# Altium PCB StickHub.altium-saved.PcbDoc
Units mil, origin at the board's own origin, x right, y up, seen from the top; angles counter-clockwise.
Board outline 649.61 x 1574.8 mil, 2 copper layers (Top Layer, Bottom Layer), stack 65.792 mil thick; 94 components, 47 nets, 278 pads, 87 vias.
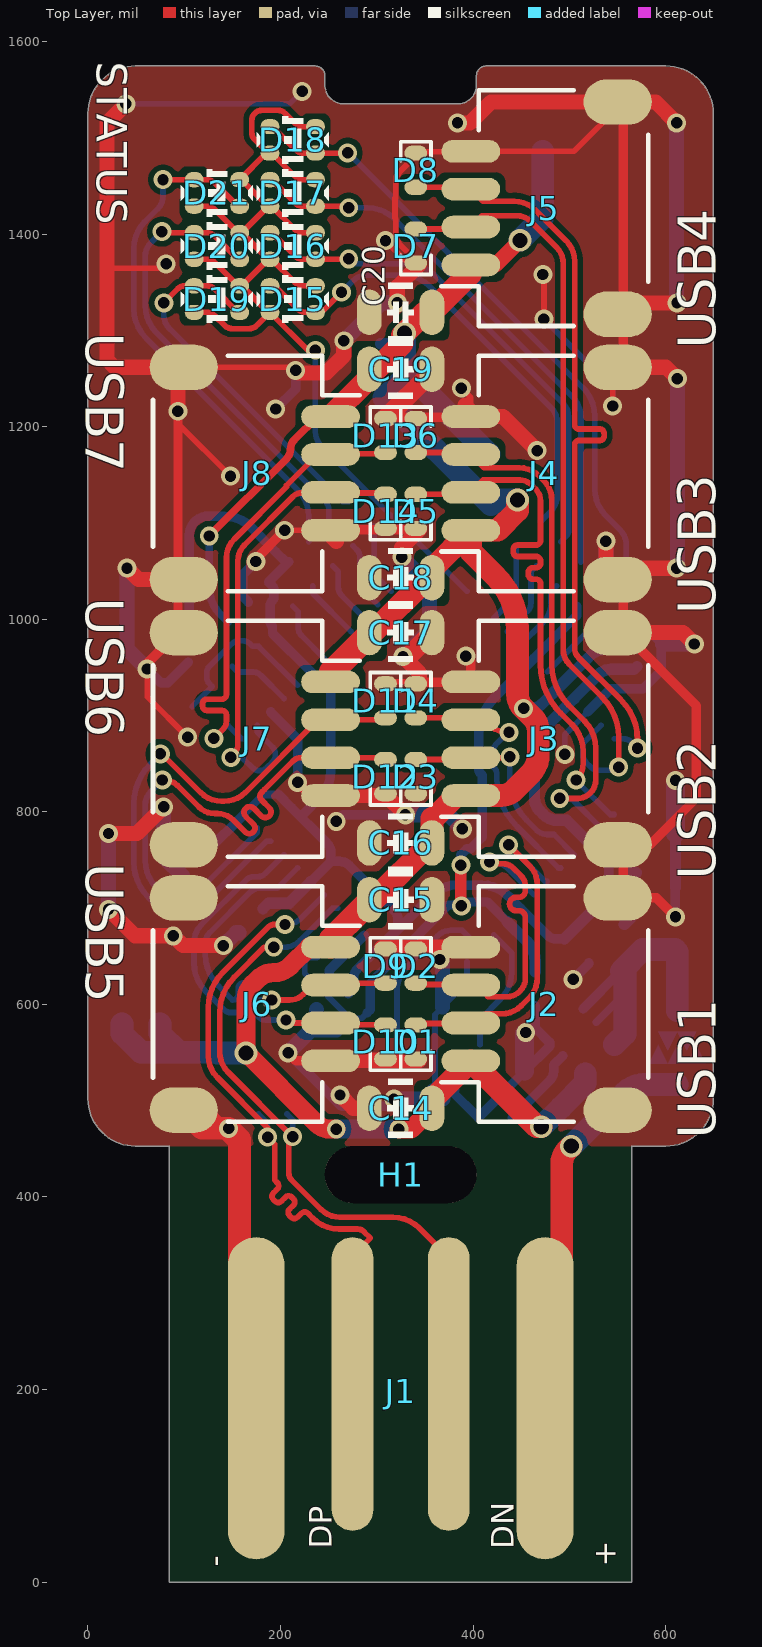
[diagram p0: Top Layer view]
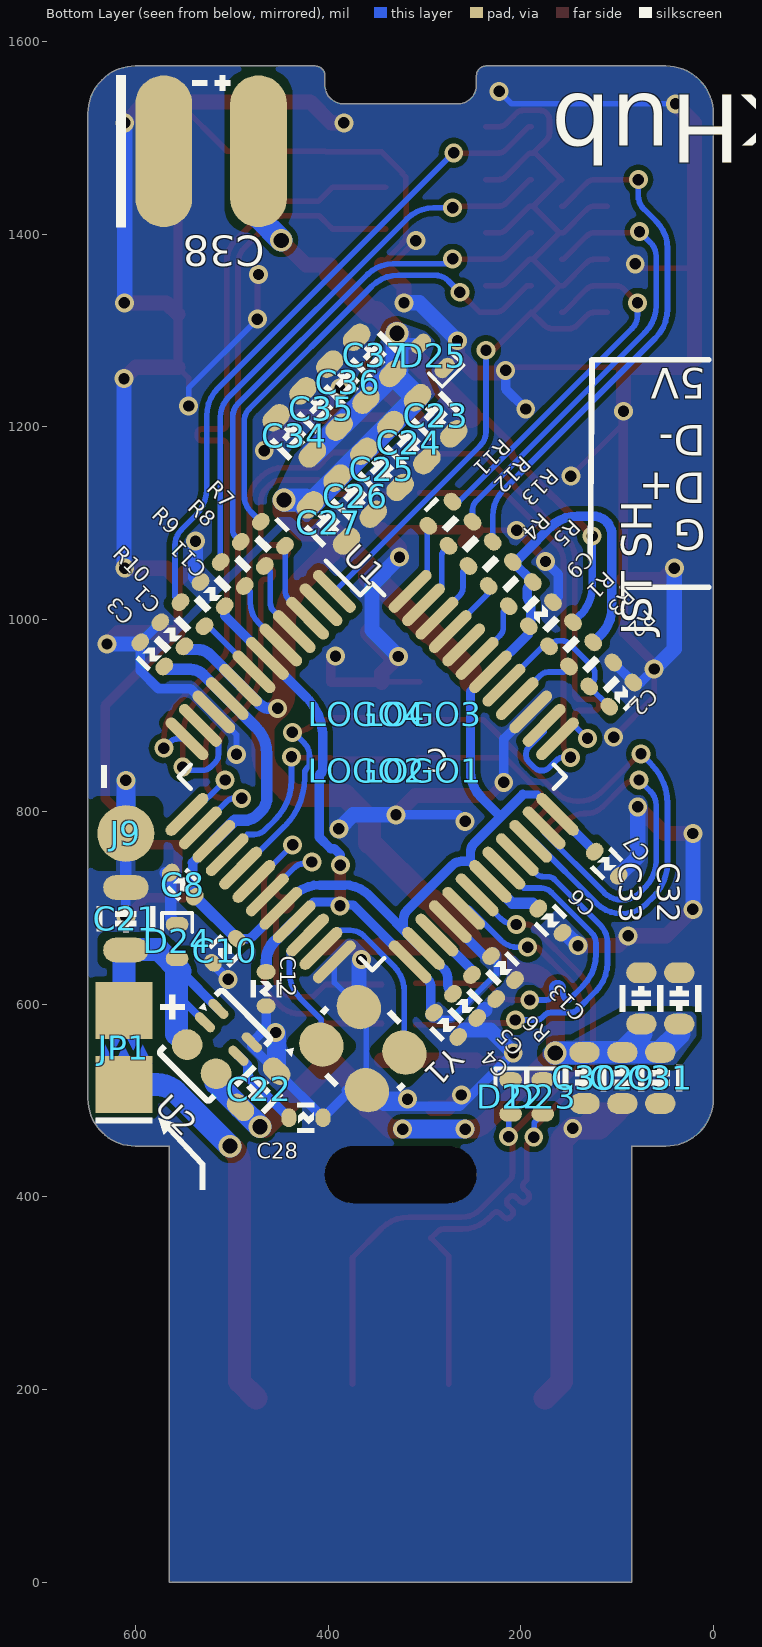
[diagram p1: Bottom Layer view, seen from below]

## Layer stack, top to bottom
Top Solder: solder mask 0.4, Solder Resist, Dk 3.5
Top Layer: signal copper 1.4
Dielectric 1: core 62.9921, FR-4, Dk 4.5
Bottom Layer: signal copper 1.4
Bottom Solder: solder mask 0.4, Solder Resist, Dk 3.5

## Board outline
403.54,1555.12 403.54,1564.96 cw(c413.39,1564.96) 413.39,1574.8 600.39,1574.8 cw(c600.39,1525.59) 649.61,1525.59 649.61,501.97 cw(c600.39,501.97) 600.39,452.76 564.96,452.76 564.96,0 84.65,0 84.65,452.76 49.21,452.76 cw(c49.21,501.97) 0,501.97 0,1525.59 cw(c49.21,1525.59) 49.21,1574.8 236.22,1574.8 cw(c236.22,1564.96) 246.06,1564.96 246.06,1555.12 ccw(c265.75,1555.12) 265.75,1535.43 383.86,1535.43 ccw(c383.86,1555.12)

## Design rules (kind name [scope] priority, off if disabled: settings)
BoardOutlineClearance [All] p1: gap=0 ignorepadtopadclearanceinfootprint=FALSE
Clearance [All] p1: gap=5.91 ignorepadtopadclearanceinfootprint=FALSE
DiffPairsRouting [All] p1: maxlimit=5.91 minlimit=5.91 mostfreqgap=5.91 toplayer_minwidth=15 toplayer_maxwidth=15 toplayer_prefwidth=5.91 bottomlayer_minwidth=15 bottomlayer_maxwidth=15 bottomlayer_prefwidth=15 maxuncoupledlength=500
HoleSize [All] p1: absolutevalues=TRUE maxlimit=157.48 minlimit=9.84 maxpercent=80.000 minpercent=20.000
HoleToHoleClearance [All] p1: gap=9.84 allowstackedmicrovias=FALSE
MinimumAnnularRing [All] p1: minimumring=3.94
PolygonConnect "PolygonConnect_Polygon 0" [InNamedPolygon('Polygon 0')] p1: connectstyle=Direct reliefconductorwidth=10 reliefentries=4 polygonreliefangle="90 Angle" airgapwidth=10
PolygonConnect "PolygonConnect_Polygon 1" [InNamedPolygon('Polygon 1')] p2: connectstyle=Direct reliefconductorwidth=10 reliefentries=4 polygonreliefangle="90 Angle" airgapwidth=10
PolygonConnect "PolygonConnect_Polygon 2" [InNamedPolygon('Polygon 2')] p3: connectstyle=Direct reliefconductorwidth=10 reliefentries=4 polygonreliefangle="90 Angle" airgapwidth=10
PolygonConnect "PolygonConnect_Polygon 3" [InNamedPolygon('Polygon 3')] p4: connectstyle=Direct reliefconductorwidth=10 reliefentries=4 polygonreliefangle="90 Angle" airgapwidth=10
PolygonConnect "PolygonConnect_Polygon 4" [InNamedPolygon('Polygon 4')] p5: connectstyle=Direct reliefconductorwidth=10 reliefentries=4 polygonreliefangle="90 Angle" airgapwidth=10
PolygonConnect [All] p6: connectstyle=Relief reliefconductorwidth=19.68 reliefentries=4 polygonreliefangle="90 Angle" airgapwidth=19.68
RoutingVias [All] p1: holewidth=11.81 width=19.68 viastyle="Through Hole" minholewidth=9.84 minwidth=19.68 maxholewidth=15.75 maxwidth=23.62
SilkToSilkClearance [All] p1: silktosilkclearance=0
SolderMaskExpansion [All] p1: expansion=0 istentingtop=FALSE
Width [All] p1: maxlimit=23.62 minlimit=5.91 preferedwidth=5.91
26 further rules are at their usual default settings.

## Components (designator, comment, footprint, x,y, rotation, side; value= is the part's Value field where it differs from the comment)
C1 "1uF 10V" 1005_C 561.93,984.46 r45 bottom
C2 "0.1uF" 1005_C 95.63,921.82 r135 bottom
C3 "10uF 6.3V" 1005_C 582.81,963.58 r45 bottom
C4 "10uF 6.3V" 1005_C 277.56,578.74 r225 bottom
C5 "0.1uF" 1005_C 257.87,598.43 r225 bottom
C6 "0.1uF" 1005_C 169.29,687.01 r225 bottom
C7 "0.1uF" 1005_C 110.74,746.14 r225 bottom
C8 "0.1uF" 1005_C 551.18,724.41 r45 bottom
C9 "0.1uF" 1005_C 179.14,1005.34 r135 bottom
C10 "0.1uF" 1005_C 507.44,655.66 r315 bottom
C11 "0.1uF" 1005_C 520.17,1026.22 r45 bottom
C12 "0.1uF" 1005_C 464.57,616.14 r270 bottom
C13 "0.1uF" 1005_C 218.5,637.8 r225 bottom
C14 "0.1uF 100V" 2012_C 324.8,492.13 r180 top
C15 "0.1uF 100V" 2012_C 324.8,708.66 r0 top
C16 "0.1uF 100V" 2012_C 324.8,767.72 r180 top
C17 "0.1uF 100V" 2012_C 324.8,986.22 r0 top
C18 "0.1uF 100V" 2012_C 324.8,1043.31 r180 top
C19 "0.1uF 100V" 2012_C 324.8,1259.84 r0 top
C20 "0.1uF 100V" 2012_C 324.8,1318.9 r180 top
C21 "0.1uF 100V" 2012_C 610.24,688.98 r90 bottom
C22 "22uF 10V" 1608_C 472.44,511.81 r135 bottom
C23 "22uF 10V" 1608_C 288.53,1211.47 r225 bottom
C24 "22uF 10V" 1608_C 316.37,1183.63 r225 bottom
C25 "22uF 10V" 1608_C 344.21,1155.79 r225 bottom
C26 "22uF 10V" 1608_C 372.05,1127.95 r225 bottom
C27 "22uF 10V" 1608_C 399.89,1100.11 r225 bottom
C28 "15nF" 1005_C 423.23,482.28 r180 bottom
C29 "22uF 10V" 1608_C 94.49,523.62 r270 bottom
C30 "22uF 10V" 1608_C 133.86,523.62 r270 bottom
C31 "22uF 10V" 1608_C 55.12,523.62 r270 bottom
C32 "22uF 10V" 1608_C 35.43,606.3 r90 bottom
C33 "22uF 10V" 1608_C 74.8,606.3 r90 bottom
C34 "22uF 10V" 1608_C 435.32,1190.67 r45 bottom
C35 "22uF 10V" 1608_C 407.48,1218.5 r45 bottom
C36 "22uF 10V" 1608_C 379.64,1246.34 r45 bottom
C37 "22uF 10V" 1608_C 351.8,1274.18 r45 bottom
C38 "330uF 10V" CP_Elec_6.3x11_Board_Edge_Mirrored 521.65,1574.8 r180 bottom
D1 "TVS" D_0402 340.55,561.02 r90 top
D2 "TVS" D_0402 340.55,639.76 r270 top
D3 "TVS" D_0402 340.55,836.61 r90 top
D4 "TVS" D_0402 340.55,915.35 r270 top
D5 "TVS" D_0402 340.55,1112.2 r90 top
D6 "TVS" D_0402 340.55,1190.94 r270 top
D7 "TVS" D_0402 340.55,1387.8 r90 top
D8 "TVS" D_0402 340.55,1466.54 r270 top
D9 "TVS" D_0402 309.06,639.76 r270 top
D10 "TVS" D_0402 309.06,561.02 r90 top
D11 "TVS" D_0402 309.06,915.35 r270 top
D12 "TVS" D_0402 309.06,836.61 r90 top
D13 "TVS" D_0402 309.06,1190.94 r270 top
D14 "TVS" D_0402 309.06,1112.2 r90 top
D15 "USB" Duo_LED_1.6x0.8_Kingbright_APHB1608LZGKSURKC 212.71,1332.68 r0 top
D16 "USB" Duo_LED_1.6x0.8_Kingbright_APHB1608LZGKSURKC 212.71,1387.8 r0 top
D17 "USB" Duo_LED_1.6x0.8_Kingbright_APHB1608LZGKSURKC 212.71,1442.91 r0 top
D18 "USB" Duo_LED_1.6x0.8_Kingbright_APHB1608LZGKSURKC 212.71,1498.03 r0 top
D19 "USB" Duo_LED_1.6x0.8_Kingbright_APHB1608LZGKSURKC 133.97,1332.68 r0 top
D20 "USB" Duo_LED_1.6x0.8_Kingbright_APHB1608LZGKSURKC 133.97,1387.8 r0 top
D21 "USB" Duo_LED_1.6x0.8_Kingbright_APHB1608LZGKSURKC 133.97,1442.91 r0 top
D22 "TVS" D_0402 210.63,503.94 r270 bottom
D23 "TVS" D_0402 177.17,503.94 r270 bottom
D24 "5V" D_0402 557.09,665.35 r270 bottom
D25 "5V" D_0402 291.34,1273.62 r45 bottom
H1 "Strap" Plain_Hole_3mm 324.8,423.23 r0 top
J1 "HOST" USB_A_PCB_traces_small 324.8,0 r90 top
J2 "USB1" JST_SH_SM04B-SRSS-TB_1x04-1MP_P1.00mm_Horizontal 476.38,600.39 r90 top
J3 "USB2" JST_SH_SM04B-SRSS-TB_1x04-1MP_P1.00mm_Horizontal 476.38,875.98 r90 top
J4 "USB3" JST_SH_SM04B-SRSS-TB_1x04-1MP_P1.00mm_Horizontal 476.38,1151.57 r90 top
J5 "USB4" JST_SH_SM04B-SRSS-TB_1x04-1MP_P1.00mm_Horizontal 476.38,1427.17 r90 top
J6 "USB5" JST_SH_SM04B-SRSS-TB_1x04-1MP_P1.00mm_Horizontal 173.23,600.39 r270 top
J7 "USB6" JST_SH_SM04B-SRSS-TB_1x04-1MP_P1.00mm_Horizontal 173.23,875.98 r270 top
J8 "USB7" JST_SH_SM04B-SRSS-TB_1x04-1MP_P1.00mm_Horizontal 173.23,1151.57 r270 top
J9 "EXTGND" 1P-1.5x1.5 610.24,777.56 r0 bottom
JP1 "EXTPWR" JP-2_1.5x1.5 610.24,555.12 r90 bottom
LOGO1 "Logo" Creative_Commons_CC_Mask 301.18,842.52 r180 bottom
LOGO2 "Logo" Creative_Commons_BY_Mask 360.24,842.52 r0 bottom
LOGO3 "Logo" Creative_Commons_NC_Mask 301.18,901.57 r0 bottom
LOGO4 "Logo" Creative_Commons_SA_Mask 360.24,901.57 r0 bottom
R1 "10k" R_1005_C 158.26,984.46 r315 bottom
R2 "100k" R_1005_C 116.51,942.7 r135 bottom
R3 "100k" R_1005_C 137.39,963.58 r315 bottom
R4 "100k" R_1005_C 220.9,1047.09 r315 bottom
R5 "100k" R_1005_C 200.02,1026.22 r315 bottom
R6 "2.7k" R_1005_C 238.19,618.11 r225 bottom
R7 "470" R_1005_C 457.53,1088.85 r225 bottom
R8 "470" R_1005_C 478.41,1067.97 r225 bottom
R9 "470" R_1005_C 499.29,1047.09 r225 bottom
R10 "470" R_1005_C 541.05,1005.34 r225 bottom
R11 "470" R_1005_C 283.54,1109.73 r315 bottom
R12 "470" R_1005_C 262.66,1088.85 r315 bottom
R13 "470" R_1005_C 241.78,1067.97 r315 bottom
U1 "MaxLinear_XR22417-48" LQFP-48_7x7mm_P0.5mm 354.33,836.61 r225 bottom
U2 "Dialog_SLG5NT1487V" TDFN-8_1.5x2mm_Fused-Lead_JEDEC_MO-252_W2015D 517.72,557.09 r225 bottom
Y1 "12MHz 50ppm 16-20pF" Crystal_4-SMD_2.5x2mm 364.07,554.05 r225 bottom

## Footprints (in the part's own frame and the unit in brackets; to place one, negate y for a bottom-side part, rotate by r counter-clockwise, add the part's x,y. Pads: shape width x height; smd on the part's side, far side on the other; paste and mask are expansions set on the pad)
1P-1.5x1.5 [mm]
  round 1.5 smd paste-1.5: 1(0,0)
1005_C [mm]
  oval 0.4x0.5 smd: 1(-0.45,0) 2(0.45,0)
  silkscreen extent -0.23,-0.4 0.23,0.4
1608_C [mm]
  oval 0.55x0.8 smd: 1(-0.675,0) 2(0.675,0)
  silkscreen extent -0.35,-0.57 0.35,0.58
2012_C [mm]
  oval 0.65x1.2 smd: 1(-0.825,0) 2(0.825,0)
  silkscreen extent -0.35,-0.77 0.35,0.77
CP_Elec_6.3x11_Board_Edge_Mirrored [mm]
  oval 1.5x4 smd paste-4: 1(1.25,-2.25) 2(-1.25,-2.25)
  silkscreen extent -2.5,-4.25 0.5,-0.25
Creative_Commons_BY_Mask [mil]
Creative_Commons_CC_Mask [mil]
Creative_Commons_NC_Mask [mil]
Creative_Commons_SA_Mask [mil]
Crystal_4-SMD_2.5x2mm [mm]
  oval 1.2x1.1 smd paste-1.2: 1(-0.85,-0.7) 2(0.85,-0.7) 3(0.85,0.7) 4(-0.85,0.7)
  round 1 smd: ""(-0.85,-0.7) ""(-0.85,0.7) ""(0.85,-0.7) ""(0.85,0.7)
  silkscreen extent -1.5,-1.47 1.5,1.25, body extent -2.75,-2.75 2.75,2.75, height 1.6
D_0402 [mm]
  oval 0.4x0.6 smd: 1(-0.45,0) 2(0.45,0)
  silkscreen extent -0.75,-0.4 -0.25,0.4
Duo_LED_1.6x0.8_Kingbright_APHB1608LZGKSURKC [mm]
  oval 0.5x0.4 smd: GA(0.6,-0.35) GK(-0.6,-0.35) RA(0.6,0.35) RK(-0.6,0.35)
  silkscreen extent -0.95,-0.63 0.95,0.63, body extent -0.95,-0.65 0.95,0.65, height 1.6
JP-2_1.5x1.5 [mm]
  rect 1.5x1.5 smd paste-1.5: 1(-0.975,0.05) 2(0.975,0.05)
  Top Layer region: 0.075,0.05 -0.425,-0.2 -0.425,0.3
  Top Layer region: 0.075,-0.45 -0.425,-0.7 -0.425,-0.2
  Top Layer region: 0.075,0.55 -0.425,0.3 -0.425,0.8
  Top Layer region: -0.075,-0.2 0.425,0.05 0.425,-0.45
  Top Layer region: -0.075,0.3 0.425,0.55 0.425,0.05
  silkscreen extent -2,-0.7 -1.85,0.8
JST_SH_SM04B-SRSS-TB_1x04-1MP_P1.00mm_Horizontal [mm]
  oval 0.6x1.55 smd: 1(-1.5,2) 2(-0.5,2) 3(0.5,2) 4(1.5,2)
  oval 1.2x1.8 smd: MP(-2.8,-1.875) MP(2.8,-1.875)
  silkscreen extent -3.11,-2.69 3.11,2.78, body extent -3.9,-3.28 3.9,3.28, height 1.6
LQFP-48_7x7mm_P0.5mm [mm]
  oval 1.475x0.3 smd: 1(-4.162,2.75) 2(-4.162,2.25) 3(-4.162,1.75) 4(-4.162,1.25) 5(-4.162,0.75) 6(-4.162,0.25) 7(-4.162,-0.25) 8(-4.162,-0.75) 9(-4.162,-1.25) 10(-4.162,-1.75) 11(-4.162,-2.25) 12(-4.162,-2.75) 25(4.163,-2.75) 26(4.162,-2.25) 27(4.163,-1.75) 28(4.163,-1.25) 29(4.163,-0.75) 30(4.162,-0.25) 31(4.163,0.25) 32(4.163,0.75) 33(4.163,1.25) 34(4.162,1.75) 35(4.162,2.25) 36(4.163,2.75)
  oval 0.3x1.475 smd: 13(-2.75,-4.162) 14(-2.25,-4.162) 15(-1.75,-4.162) 16(-1.25,-4.162) 17(-0.75,-4.162) 18(-0.25,-4.162) 19(0.25,-4.162) 20(0.75,-4.162) 21(1.25,-4.162) 22(1.75,-4.162) 23(2.25,-4.162) 24(2.75,-4.162) 37(2.75,4.163) 38(2.25,4.162) 39(1.75,4.162) 40(1.25,4.163) 41(0.75,4.163) 42(0.25,4.163) 43(-0.25,4.162) 44(-0.75,4.162) 45(-1.25,4.163) 46(-1.75,4.163) 47(-2.25,4.162) 48(-2.75,4.163)
  silkscreen extent -4.9,-3.61 3.61,3.61
Plain_Hole_3mm [mm]
  oval 4x1.5 hole 1.5 slot 4 at 0 deg unplated: ""(0,0)
R_1005_C [mm]
  oval 0.4x0.5 smd: 1(-0.45,0) 2(0.45,0)
  silkscreen extent -0.23,-0.4 0.23,0.4
TDFN-8_1.5x2mm_Fused-Lead_JEDEC_MO-252_W2015D [mm]
  oval 0.65x0.25 smd: 1(-0.625,0.75) 2(-0.625,0.25) 7(0.625,0.25) 8(0.625,0.75)
  oval 0.815x0.8 smd: 3(-0.543,-0.5) 5(0.543,-0.5)
  silkscreen extent -1,-1.25 1,1.25, body extent -2,-2 2,2, height 1.6
USB_A_PCB_traces_small [mm]
  oval 8.5x1.5 smd paste-8.5: 1(4.85,-3.81) 4(4.85,3.81)
  oval 7.75x1.1 smd paste-7.75: 2(5.225,-1.27) 3(5.225,1.27)

## Via types
v1: diameter 19.68, hole 11.81, Top Layer to Bottom Layer, 81 vias
v2: diameter 23.62, hole 15.75, Top Layer to Bottom Layer, 6 vias

## Nets (pads, with @x,y where several pads share a name; then routed paths per layer and width w, separated by ;. In a path a pad name is that pad's centre, name@x,y a point inside that pad or via, vN(x,y) a via of type N, cw(c..) or ccw(c..) an arc to the next point about the centre after c; other vN are vias at no path point)
+1V8: C4.1 C11.1 C12.1 C13.1 U1.6 U1.21 U1.25 U1.28 | length 809.4
  Top Layer w11.81: v1(387.4,744.69) 387.4,702.76 v1(387.8,702.36)
  Bottom Layer w5.91: C13.1 225.32,644.62 225.32,632.09 271.85,585.56 284.38,585.56 C4.1
  Bottom Layer w9.84: C13.1 237.64,650.32 U1.28 ; C4.1 293.33,594.52 293.33,617.61 cw(c305.15,617.61) 296.79,625.96 U1.25 374.09,703.26 386.9,703.26 v1(387.8,702.36) ; v1(387.4,744.69) 387.4,755.51 393.56,761.67 397.49,761.67 409.59,773.77 409.59,838.14 406.92,840.82 405.72,843.71 405.71,845.27 405.71,877.45 405.79,882.09 407.24,891.26 410.11,900.09 414.33,908.36 419.78,915.87 423.01,919.21 U1.6 507.64,1003.85 C11.1 ; v1@387.8,702.81 v1(387.8,702.36) ; U1.21 414.98,706.37 391.8,706.37 v1(387.8,702.36)
  Bottom Layer w11.81: U1.21 455.92,665.43 cw(c435.04,644.55) 464.57,644.55 C12.1
+3.3V: C3.1 C5.1 C6.1 C7.1 C8.1 C9.1 C10.1 R3.1 R4.1 R5.1 U1.9 U1.15 U1.20 U1.26 U1.31 U1.36 U1.42 | length 1698.3
  Bottom Layer w7.87: U1.36 182.68,818.08 197.76,818.08
  Bottom Layer w9.84: C7.1 U1.36 ; R3.1 116.85,984.12 cw(c144.68,1011.96) 105.31,1011.96 105.31,1087.6 cw(c125,1087.6) 125,1107.28 141.56,1107.28 cw(c141.56,1067.91) 169.4,1095.75 195.08,1070.07 205.53,1059.62 R4.1 R5.1 191.47,1034.77 cw(c187.3,1030.59) 193.2,1030.59 193.2,1023.51 cw(c187.3,1023.51) 191.47,1019.34 191.18,1019.05 ccw(c195.36,1014.87) 189.45,1014.87 189.45,997.47 ccw(c195.36,997.47) 191.18,993.3 C9.1 191.67,985.35 U1.42 252.28,924.75 252.28,843.79 252.28,842.53 cw(c212.91,842.53) 240.75,814.7 222.9,796.85 218.99,796.85 211.68,804.16 ; 197.76,818.08 211.68,804.16 ; U1.31 252.28,748.48 ; C5.1 272.65,613.2 ccw(c264.3,621.55) 276.11,621.55 276.11,628.22 cw(c287.92,628.22) 279.57,636.58 U1.26 ; C10.1 485.89,668.19 cw(c485.89,680) 477.54,671.65 U1.20 436.7,712.48 ccw(c408.86,684.65) 408.86,724.02 383.06,724.02 ccw(c383.06,688.58) 358.01,713.64 302.47,658.1 U1.26 ; U1.15 541.17,747.21 540.98,747.02 540.98,714.2 C8.1 C8.1@541.17,714.4 ; 211.68,804.16 243.94,771.9 248.24,767.6 cw(c238.5,757.85) 252.28,757.85 252.28,748.48 ; 252.28,748.48 261.65,748.48 cw(c261.65,734.7) 271.39,744.44 317.84,698 cw(c308.09,688.26) 321.87,688.26 321.87,678.88 U1.26
  Bottom Layer w11.81: C6.1 187.53,705.24 209.04,705.24 U1.31 ; C10.1@494.96,668.19 C8.1 ; U1.15 497.16,791.22 487.4,791.22 cw(c487.4,810.91) 473.48,796.99 469.55,800.93 cw(c483.46,814.85) 463.78,814.85 463.78,860.16 cw(c503.15,860.16) 475.31,888 U1.9 529.56,942.25 cw(c543.48,928.33) 543.48,948.01 567.24,948.01 C3.1
+5V: C1.1 C14.1 C15.1 C16.1 C17.1 C18.1 C19.1 C20.1 C22.1 C23.1 C24.1 C25.1 C26.1 C27.1 C29.1 C30.1 C31.1 C32.1 C33.1 C34.1 C35.1 C36.1 C37.1 C38.1 D25.2 J2.1 J3.1 J4.1 J5.1 J6.1 J7.1 J8.1 R1.1 U1.8 U2.5 | length 3452.6
  Top Layer w7.87: v1(125.98,1086.61) 206.28,1166.91 ccw(c196.54,1176.66) 210.32,1176.66 cw(c224.1,1176.69) 214.36,1186.43 238.56,1210.63 J8.1
  Top Layer w15.75: J7.1@248.03,935.04 J7.1@251.97,938.98 ; J8.1@250.43,1210.63 328.74,1288.94 v2(328.74,1297.24) J5.1@399.61,1368.11 ; J6.1 292.32,699.8 C15.1 ; J7.1@253.94,938.98 283.66,968.7 283.66,970.67 293.31,980.32 293.31,984.25 355.91,1046.85 C18.1@356.3,1046.85 ; C18.1@356.3,1045.28 C18.1@356.3,1046.85 ; J5.1 423.23,1368.11 v2(448.82,1393.7) ; J4.1@425.59,1092.52 403.54,1092.52 400.79,1092.52 356.3,1048.03 C18.1@356.3,1046.85 ; v1(452.62,907.48) 469.63,890.47
  Top Layer w19.68: J6.1 229.65,659.45 210.19,639.99 cw(c193.48,656.69) 193.48,633.07 192.86,633.07 ccw(c192.86,609.45) 176.15,626.15 171.09,621.09 ccw(c187.8,604.39) 164.17,604.39 v2(164.17,549.61) 237.54,476.24 ccw(c251.46,490.16) 251.46,470.47 v1(257.87,470.47) ; v1(322.83,470.47) 335.63,470.47 C14.1
  Top Layer w23.62: J6.1 251.97,668.31 C15.1 296.75,708.66 355.81,767.72 C16.1 357.28,793.11 358.91,793.11 382.73,816.93 J3.1 428.85,816.93 ccw(c428.85,836.61) 442.77,822.69 459.12,839.04 ccw(c438.24,859.92) 467.77,859.92 467.77,884.17 ccw(c448.09,884.17) 462,898.09 v1(452.62,907.48) 451.83,908.27 cw(c465.75,922.19) 446.06,922.19 446.06,989.43 ccw(c367.32,989.43) 423,1045.11 397.64,1070.47 J4.1 ; J7.1 251.97,945.87 C17.1 295.77,986.22 352.85,1043.31 C18.1 357.28,1052.17 J4.1 ; J8.1 292.32,1250.98 C19.1 299.65,1259.84 326.57,1286.77 326.57,1295.08 v2(328.74,1297.24) 350.39,1318.9 C20.1 J5.1@397.64,1359.25 ; C14.1 357.28,500.98 J2.1 466.14,472.83 v2(470.87,472.83) ; v2(446.06,1124.02) 446.06,1112.99 425.59,1092.52 J4.1
  Bottom Layer w7.87: v1(125.98,1086.61) 125.98,1033.04 ccw(c165.35,1033.04) 137.52,1005.21 R1.1
  Bottom Layer w11.81: D25.2 317.65,1286.15 v2(328.74,1297.24) ; v1(452.62,907.48) 460.43,907.48 ccw(c460.43,923.22) 471.56,912.09 U1.8 522.44,962.96 cw(c536.36,949.04) 536.36,968.73 546.2,968.73 C1.1
  Bottom Layer w19.68: v1(257.87,470.47) v1(322.83,470.47)
  Bottom Layer w23.62: C32.1 35.43,569.88 C31.1 C29.1 ; C33.1 74.8,569.88 C29.1 ; v2(164.17,549.61) 134.45,549.61 C30.1 C29.1 ; v2@328.18,1296.68 v2(328.74,1297.24) 328.74,1259.66 C37.1 ; C34.1 C37.1 ; v2(446.06,1124.02) 423.79,1124.02 C27.1 C23.1 307.88,1230.26 C37.1 ; v2(448.82,1393.7) 472.44,1417.32 C38.1 ; v2(470.87,472.83) 471.05,472.83 C22.1 516.53,518.32 U2.5
/D+: D23.2 J1.3 U1.30 | length 738.3
  Top Layer w5.91: v1(204.63,683.04) 193.97,683.04 ccw(c193.97,673.2) 187.01,680.16 139.99,633.14 ccw(c176.18,596.95) 125,596.95 125,546.54 ccw(c156.5,546.54) 134.22,524.27 186.58,471.91 v1(186.58,462.17) 193.9,454.85 193.9,417.52 196.65,414.76 197.31,413.94 197.77,412.98 198.01,411.95 198.01,410.89 197.77,409.86 197.31,408.91 196.65,408.08 192.58,404.01 191.92,403.18 191.46,402.23 191.23,401.2 191.23,400.14 191.46,399.11 191.92,398.16 192.58,397.33 194.25,395.66 195.08,395 196.03,394.54 197.06,394.3 198.12,394.3 199.15,394.54 200.1,395 200.93,395.66 205.01,399.73 205.83,400.39 206.79,400.85 207.82,401.08 208.87,401.08 209.91,400.85 210.86,400.39 211.69,399.73 213.36,398.06 214.02,397.23 214.48,396.28 214.71,395.25 214.71,394.19 214.48,393.16 214.02,392.21 213.36,391.38 209.28,387.31 208.62,386.48 208.17,385.53 207.93,384.49 207.93,383.44 208.17,382.41 208.62,381.45 209.28,380.62 210.95,378.95 211.78,378.29 212.73,377.84 213.77,377.6 214.82,377.6 215.85,377.84 216.81,378.29 217.64,378.95 221.71,383.03 222.54,383.69 223.49,384.15 224.52,384.38 225.58,384.38 226.61,384.15 227.56,383.69 228.39,383.03 233.12,378.29 233.25,378.17 ccw(c261.09,406) 261.09,366.63 279.88,366.63 cw(c279.88,356.79) 286.84,363.75 293.31,357.28 274.8,338.78 274.8,295.59 J1.3
  Bottom Layer w5.91: D23.2 186.02,477.36 186.02,462.73 v1(186.58,462.17) ; v1(204.63,683.04) 206.53,683.04 ccw(c206.53,702.73) 220.44,688.81 U1.30
/D-: D22.2 J1.2 U1.29 | length 734.5
  Top Layer w5.91: v1(192.95,659.41) 182.97,659.41 152.19,628.64 ccw(c189.33,591.5) 136.81,591.5 136.81,550.29 ccw(c165.56,550.29) 145.23,529.97 v1(212.6,462.6) 208.66,458.66 208.66,424.55 ccw(c218.5,424.55) 211.54,417.59 242.12,387.01 ccw(c261.61,406.5) 261.61,378.94 316.57,378.94 cw(c316.57,339.57) 344.41,367.41 374.8,337.01 J1.2
  Bottom Layer w5.91: v1(192.95,659.41) 203.61,659.41 ccw(c203.61,683.04) 220.32,666.33 253.84,699.86 U1.29 ; D22.2@206.69,486.22 212.6,480.32 v1(212.6,462.6)
/LC: D15.GK D15.RA D16.GK D16.RA D17.GK D17.RA D18.GK D18.RA D19.GK D19.RA D20.GK D20.RA D21.GK D21.RA U1.1 | length 1132.5
  Top Layer w5.91: D19.GK 123.28,1318.9 cw(c123.28,1307.09) 131.63,1315.44 141.64,1305.43 ccw(c149.99,1313.78) 149.99,1301.97 167.26,1301.97 ccw(c167.26,1313.78) 175.62,1305.43 D15.GK ; D20.GK 123.28,1374.02 cw(c123.28,1362.2) 131.63,1370.56 155.73,1346.46 D19.RA D19.RA@159.67,1346.46 ; D21.GK 123.28,1429.13 cw(c123.28,1417.32) 131.63,1425.67 155.73,1401.57 D20.RA D20.RA@159.67,1401.57 ; v1(236.22,1279.53) 228.46,1279.53 D15.GK ; D15.RA 223.4,1346.46 cw(c223.4,1358.27) 215.04,1349.92 190.94,1374.02 D16.GK D16.GK@187.23,1374.02 ; D16.RA 223.4,1401.57 cw(c223.4,1413.39) 215.04,1405.03 190.94,1429.13 D17.GK ; D17.RA 223.4,1456.69 cw(c223.4,1468.5) 215.04,1460.15 190.94,1484.25 D18.GK ; D18.RA 222.58,1511.81 cw(c222.58,1521.65) 215.62,1514.69 207.48,1522.83 204.46,1525.86 ccw(c197.5,1518.9) 197.5,1528.74 180.46,1528.74 ccw(c180.46,1518.9) 173.5,1525.86 173.07,1525.43 ccw(c180.03,1518.47) 170.19,1518.47 170.19,1505.37 ccw(c180.03,1505.37) 173.07,1498.41 187.23,1484.25 D18.GK ; D19.RA@159.67,1346.46 D16.GK@187.23,1374.02 ; D19.RA@159.67,1346.46 187.23,1318.9 D15.GK ; D20.RA@159.67,1401.57 D16.GK@187.23,1374.02 ; D20.RA@159.67,1401.57 187.23,1429.13 D17.GK ; D17.GK 187.01,1429.13 159.45,1456.69 D21.RA 185.15,1484.25 D18.GK
  Bottom Layer w5.91: v1(236.22,1279.53) 236.22,1194.64 ccw(c255.91,1194.64) 241.99,1180.72 U1.1
/LED1: R7.2 U1.3 | length 84.3
  Bottom Layer w5.91: U1.3 441.3,1021.02 ccw(c432.95,1029.37) 444.76,1029.37 444.76,1076.08 R7.2
/LED2: R8.2 U1.4 | length 80.3
  Bottom Layer w5.91: U1.4 456.72,1008.6 ccw(c448.37,1016.95) 460.18,1016.95 460.18,1049.74 R8.2
/LED3: R9.2 U1.5 | length 75.4
  Bottom Layer w5.91: U1.5 472.41,996.45 ccw(c451.53,1017.33) 481.06,1017.33 481.06,1028.86 R9.2
/LED4: R10.2 U1.7 | length 70.9
  Bottom Layer w5.91: U1.7 524.44,992.81 R10.2
/LED5: R11.2 U1.48 | length 76
  Bottom Layer w5.91: R11.2 297.24,1096.03 297.24,1046.81 U1.48
/LED6: R12.2 U1.47 | length 71.5
  Bottom Layer w5.91: R12.2 279.39,1072.12 cw(c272.43,1065.16) 282.27,1065.16 282.27,1033.95 U1.47
/LED7: R13.2 U1.46 | length 67.3
  Bottom Layer w5.91: R13.2 260.02,1049.74 260.02,1033.26 ccw(c271.83,1033.26) 263.47,1024.91 U1.46
/U1D+: D2.2 J2.3 U1.19 | length 352.2
  Top Layer w5.91: D2.2@344.49,620.67 381.49,620.67 402.95,620.67 415.55,608.07 435.6,608.07 ccw(c435.6,625.79) 448.13,613.26 449.14,614.27 ccw(c436.61,626.8) 454.33,626.8 454.33,690.55 454.16,692.08 453.65,693.54 452.83,694.85 451.74,695.94 450.43,696.76 448.97,697.27 447.44,697.44 444.81,697.44 443.28,697.61 441.82,698.12 440.52,698.94 439.43,700.04 438.61,701.34 438.1,702.8 437.92,704.33 438.1,705.86 438.61,707.32 439.43,708.63 440.52,709.72 441.82,710.54 443.28,711.05 444.81,711.22 447.44,711.22 448.97,711.39 450.43,711.9 451.74,712.72 452.83,713.81 453.65,715.12 454.16,716.58 454.33,718.11 454.33,722.61 ccw(c438.58,722.61) 449.72,733.75 442.01,741.45 ccw(c430.88,730.32) 430.88,746.06 418.98,746.06 v1(417.13,747.92)
  Bottom Layer w5.91: v1(417.13,747.92) 418.98,746.06 426.07,746.06 cw(c426.07,734.25) 434.42,742.6 U1.19
/U1D-: D1.2 J2.2 U1.18 | length 351.9
  Top Layer w5.91: D1.2@344.49,580.12 402.95,580.12 403.54,580.71 412.99,590.16 429.5,590.16 ccw(c429.5,619.68) 450.38,598.81 458.08,606.51 ccw(c437.2,627.39) 466.73,627.39 466.73,724.61 ccw(c439.17,724.61) 458.66,744.1 v1(437.01,765.75)
  Bottom Layer w5.91: v1(437.01,765.75) 475.06,727.69 U1.18
/U2D+: D4.2 J3.3 U1.17 | length 277.3
  Top Layer w5.91: D4.2 395.67,897.64 J3.3 410.63,895.67 414.41,891.89 ccw(c436.68,914.16) 436.68,882.66 v1(437.35,882.66)
  Bottom Layer w5.91: v1(437.35,882.66) 436.09,882.66 425.25,871.83 ccw(c439.17,857.91) 419.49,857.91 419.49,851.37 ccw(c427.36,851.37) 421.8,845.8 422.3,845.3 cw(c416.73,839.73) 424.61,839.73 424.61,835.18 ccw(c495.47,835.18) 445.36,785.07 488.82,741.61 U1.17
/U2D-: D3.2 J3.2 U1.16 | length 232.6
  Top Layer w5.91: D3.2 395.67,854.33 J3.2 437.4,856.3 v1(438.19,857.09)
  Bottom Layer w5.91: v1(438.19,857.09) 438.19,833.41 ccw(c497.24,833.41) 455.49,791.65 466.07,781.07 ccw(c477.2,792.21) 477.2,776.46 484.08,776.46 U1.16
/U3D+: D6.2 J4.3 U1.14 | length 574.9
  Top Layer w5.91: D6.2 395.67,1173.23 J4.3 411.42,1157.48 448.01,1157.48 cw(c448.01,1127.95) 468.88,1148.83 473.24,1144.48 cw(c452.36,1123.6) 481.89,1123.6 481.89,952.81 ccw(c540.94,952.81) 499.19,911.05 515.71,894.52 cw(c487.59,866.4) 527.36,866.4 527.36,832.61 cw(c509.65,832.61) 522.17,820.09 521.25,819.17 cw(c508.73,831.69) 508.73,813.98 v1(490.05,813.98)
  Bottom Layer w5.91: v1(490.05,813.98) 498.17,813.98 cw(c498.17,804.13) 505.13,811.09 U1.14
/U3D-: D5.2 J4.2 U1.13 | length 573.6
  Top Layer w5.91: D5.2 395.67,1129.92 J4.2 410.43,1144.69 448.37,1144.69 cw(c448.37,1126.97) 460.9,1139.5 464.89,1135.51 cw(c452.36,1122.98) 470.08,1122.98 470.08,1108.66 470.08,1089.48 470.02,1089.42 470.08,1088.89 470.08,1081.89 469.96,1080.84 469.61,1079.84 469.05,1078.95 468.3,1078.2 467.4,1077.63 466.4,1077.29 465.35,1077.17 446.36,1077.17 445.31,1077.05 444.31,1076.7 443.42,1076.14 442.67,1075.39 442.11,1074.49 441.76,1073.49 441.64,1072.44 441.64,1070.08 441.76,1069.03 442.11,1068.03 442.67,1067.13 443.42,1066.39 444.31,1065.82 445.31,1065.47 446.36,1065.36 465.35,1065.36 466.4,1065.24 467.4,1064.89 468.3,1064.32 469.05,1063.58 469.61,1062.68 469.96,1061.68 470.08,1060.63 470.08,1058.27 469.96,1057.22 469.61,1056.22 469.05,1055.32 468.3,1054.58 467.4,1054.01 466.4,1053.66 465.35,1053.54 462.11,1053.54 461.06,1053.43 460.06,1053.08 459.17,1052.51 458.42,1051.77 457.85,1050.87 457.51,1049.87 457.39,1048.82 457.39,1046.46 457.51,1045.41 457.85,1044.41 458.42,1043.51 459.17,1042.76 460.06,1042.2 461.06,1041.85 462.11,1041.73 465.35,1041.73 466.4,1041.62 467.4,1041.27 468.3,1040.7 469.05,1039.95 469.61,1039.06 469.96,1038.06 470.08,1037.01 470.08,952.81 ccw(c540.94,952.81) 490.83,902.7 502.84,890.69 cw(c475,862.85) 514.37,862.85 514.37,850.19 cw(c490.75,850.19) 507.45,833.48 v1(507.06,833.09)
  Bottom Layer w5.91: v1(507.06,833.09) 507.06,832.7 542.47,797.29 U1.13
/U4D+: D8.2 J5.3 U1.12 | length 812.1
  Top Layer w5.91: D8.2 395.67,1448.82 J5.3 410.24,1434.25 442.63,1434.25 cw(c442.63,1402.76) 464.91,1425.03 496.65,1393.28 cw(c475.27,1371.89) 505.51,1371.89 505.51,1202.36 505.63,1201.31 505.98,1200.31 506.54,1199.42 507.29,1198.67 508.19,1198.11 509.18,1197.76 510.24,1197.64 531.48,1197.64 532.53,1197.52 533.53,1197.17 534.43,1196.61 535.18,1195.86 535.74,1194.96 536.09,1193.96 536.21,1192.91 536.21,1190.55 536.09,1189.5 535.74,1188.5 535.18,1187.61 534.43,1186.86 533.53,1186.29 532.53,1185.95 531.48,1185.83 510.24,1185.83 509.18,1185.71 508.19,1185.36 507.29,1184.8 506.54,1184.05 505.98,1183.15 505.63,1182.15 505.51,1181.1 505.51,969.96 ccw(c518.62,969.96) 509.35,960.69 553.57,916.47 cw(c511.81,874.72) 570.87,874.72 v1(570.87,866.14)
  Bottom Layer w5.91: U1.12 556.18,875.94 cw(c556.18,864.13) 564.53,872.48 v1(570.87,866.14)
/U4D-: D7.2 J5.2 U1.11 | length 812
  Top Layer w5.91: D7.2 395.67,1405.51 J5.2 409.45,1419.29 445.78,1419.29 cw(c445.78,1399.61) 459.7,1413.53 486.66,1386.56 cw(c469.68,1369.58) 493.7,1369.58 493.7,968.15 ccw(c514.26,968.15) 499.72,953.62 533.88,919.45 cw(c492.13,877.7) 551.18,877.7 v1(551.18,846.46)
  Bottom Layer w5.91: U1.11 514.03,871.04 514.03,859.7 ccw(c525.84,859.7) 517.49,851.34 522.17,846.66 ccw(c530.53,855.01) 530.53,843.2 547.92,843.2 v1(551.18,846.46)
/U5D+: D10.2 J6.3 U1.33 | length 389.6
  Top Layer w5.91: v1(205.73,583.81) 208.83,580.71 J6.3 253.94,578.74 D10.2
  Bottom Layer w5.91: U1.33 183.68,735.56 cw(c176.72,742.52) 176.72,732.68 171.9,732.68 ccw(c171.9,722.84) 164.94,729.79 117.53,682.39 ccw(c135.62,664.29) 110.04,664.29 110.04,643.14 ccw(c151.94,643.14) 122.31,613.52 141.41,594.42 ccw(c148.37,601.38) 148.37,591.54 168.56,591.54 cw(c168.56,581.69) 175.52,588.65 177.48,586.69 ccw(c184.44,593.65) 184.44,583.81 188.53,583.81 v1(205.73,583.81)
/U5D-: D9.2 J6.2 U1.32 | length 390.4
  Top Layer w5.91: v1(190.73,604.54) 209.38,604.54 ccw(c209.38,624.23) 223.3,610.31 233.07,620.08 J6.2 253.94,622.05 D9.2
  Bottom Layer w5.91: v1(190.73,604.54) 189.55,604.54 173.8,604.54 172.49,604.69 171.24,605.13 170.12,605.83 169.19,606.77 168.48,607.89 168.05,609.13 167.9,610.45 167.9,616.71 167.75,618.02 167.31,619.27 166.61,620.39 165.67,621.33 164.55,622.03 163.31,622.47 161.99,622.61 160.68,622.47 159.43,622.03 158.31,621.33 157.37,620.39 156.67,619.27 156.23,618.02 156.09,616.71 156.09,610.45 155.94,609.13 155.5,607.89 154.8,606.77 153.86,605.83 152.74,605.13 151.5,604.69 150.18,604.54 135.5,619.22 cw(c168.46,652.18) 121.85,652.18 121.85,663.17 cw(c138.33,663.17) 126.68,674.83 168.1,716.25 cw(c179.24,705.12) 179.24,720.87 196.82,720.87 U1.32
/U6D+: D12.2 J7.3 U1.35 | length 610.7
  Top Layer w5.91: v1(77.17,833.07) 79.08,833.07 cw(c79.08,813.39) 93,827.31 115.16,805.15 ccw(c131.86,821.85) 131.86,798.23 134.4,798.23 cw(c134.4,774.61) 151.11,791.31 163.35,779.07 164.38,778.25 165.57,777.67 166.86,777.38 168.19,777.38 169.47,777.67 170.67,778.25 171.7,779.07 172.52,780.1 173.1,781.3 173.39,782.58 173.39,783.91 173.1,785.2 172.52,786.39 171.7,787.42 163.76,795.36 162.94,796.39 162.36,797.59 162.07,798.87 162.07,800.2 162.36,801.49 162.94,802.68 163.76,803.71 164.8,804.54 165.99,805.11 167.28,805.4 168.6,805.4 169.89,805.11 171.08,804.54 172.11,803.71 180.05,795.77 181.09,794.95 182.28,794.37 183.57,794.08 184.89,794.08 186.18,794.37 187.37,794.95 188.4,795.77 189.23,796.81 189.8,798 190.1,799.29 190.1,800.61 189.8,801.9 189.23,803.09 188.4,804.12 180.46,812.06 179.64,813.1 179.07,814.29 178.77,815.58 178.77,816.9 179.07,818.19 179.64,819.38 180.47,820.41 183.37,823.32 212.89,852.84 cw(c221.24,844.49) 221.24,856.3 J7.3 307.09,856.3 D12.2
  Bottom Layer w5.91: v1(77.17,833.07) 65.21,821.12 ccw(c79.13,807.2) 59.45,807.2 59.45,749.38 ccw(c98.82,749.38) 70.98,721.54 76.36,716.16 ccw(c94.46,734.25) 94.46,708.66 95.31,708.66 ccw(c95.31,734.25) 113.4,716.16 175.81,778.57 U1.35
/U6D-: D11.2 J7.2 U1.34 | length 611.4
  Top Layer w5.91: v1(75.2,860.24) 76.77,860.24 116.76,820.25 ccw(c139.03,842.52) 139.03,811.02 141.32,811.02 ccw(c141.32,842.52) 163.6,820.25 239.02,895.67 J7.2 307.09,895.67 D11.2
  Bottom Layer w5.91: v1(75.2,860.24) 64.93,849.97 ccw(c106.69,808.22) 47.64,808.22 47.64,747.58 ccw(c98.82,747.58) 62.63,711.39 69.35,704.67 ccw(c94.4,729.72) 94.4,694.29 95.76,694.29 ccw(c95.75,729.73) 120.81,704.67 185.59,769.45 U1.34
/U7D+: D14.2 J8.3 U1.38 | length 486.7
  Top Layer w5.91: v1(148.43,856.69) 151.1,859.36 ccw(c139.96,870.5) 155.71,870.5 155.71,1060.62 cw(c179.33,1060.62) 162.63,1077.32 213.15,1127.84 cw(c221.5,1119.49) 221.5,1131.3 D14.2@305.12,1131.3
  Bottom Layer w5.91: v1(148.43,856.69) 155.77,856.69 cw(c155.77,846.85) 162.73,853.81 170.74,845.8 ccw(c177.7,852.76) 177.7,842.91 178.66,842.91 ccw(c178.66,852.76) 185.62,845.8 191.75,851.92 ccw(c184.79,858.88) 194.63,858.88 194.63,860.28 ccw(c184.79,860.28) 191.75,867.24 175.81,883.18 U1.38
/U7D-: D13.2 J8.2 U1.37 | length 489.4
  Top Layer w5.91: v1(130.71,876.38) 140.44,886.11 ccw(c132.09,894.46) 143.9,894.46 143.9,900.59 143.78,901.64 143.43,902.64 142.87,903.54 142.12,904.28 141.22,904.85 140.22,905.2 139.17,905.32 123.7,905.32 122.65,905.43 121.65,905.78 120.76,906.35 120.01,907.09 119.45,907.99 119.1,908.99 118.98,910.04 118.98,912.4 119.1,913.45 119.45,914.45 120.01,915.35 120.76,916.1 121.65,916.66 122.65,917.01 123.7,917.13 139.17,917.13 140.22,917.24 141.22,917.59 142.12,918.16 142.87,918.91 143.43,919.8 143.78,920.8 143.9,921.85 143.9,1064.03 cw(c171.09,1064.03) 151.86,1083.26 206.3,1137.7 206.3,1139.13 239.02,1171.85 D13.2@305.12,1171.85
  Bottom Layer w5.91: v1(130.71,876.38) 131.1,876.38 145.08,890.35 159.5,875.94 U1.37
/XI: U1.22 Y1.1 | length 133.6
  Bottom Layer w5.91: Y1.1 407.22,584.39 428.78,605.94 ccw(c400.94,633.78) 440.31,633.78 440.31,653.2 U1.22
/XO: U1.23 Y1.3 | length 190.9
  Bottom Layer w5.91: Y1.3 320.92,612.75 cw(c360.29,612.75) 332.46,640.59 363.02,671.15 cw(c376.94,657.23) 376.94,676.91 388.76,676.91 U1.23
GND: C1.2 C2.2 C3.2 C4.2 C5.2 C6.2 C7.2 C8.2 C9.2 C10.2 C11.2 C12.2 C13.2 C14.2 C15.2 C16.2 C17.2 C18.2 C19.2 C20.2 C21.2 C22.2 C23.2 C24.2 C25.2 C26.2 C27.2 C28.2 C29.2 C30.2 C31.2 C32.2 C33.2 C34.2 C35.2 C36.2 C37.2 C38.2 D1.1 D2.1 D3.1 D4.1 D5.1 D6.1 D7.1 D8.1 D9.1 D10.1 D11.1 D12.1 D13.1 D14.1 D22.1 D23.1 D24.1 D25.1 J1.4 J2.4 J2.MP J3.4 J3.MP J4.4 J4.MP J5.4 J5.MP J6.4 J6.MP J7.4 J7.MP J8.4 J8.MP J9.1 R2.2 R6.2 U1.10 U1.24 U1.39 U2.8 Y1.2 Y1.4 | length 7737.2
  Top Layer w5.91: 19.68,1364.57 76.38,1364.57 v1(81.1,1369.29) ; v1(61.42,948.43) 61.42,919.69 v1(103.54,877.56) ; v1(93.31,1216.14) 93.31,1203.54 v1(148.03,1148.82) ; J6.MP@93.5,490.16 127.17,490.16 v1(146.06,471.26) ; J8.MP@93.5,1261.81 212.6,1261.81 v1(215.75,1258.66) ; v1(204.28,1092.52) J8.4@246.06,1092.52 ; D11.1@305.12,935.04 343.9,935.04 D4.1@344.49,934.45 ; v1(309.06,1393.31) 332.28,1370.08 D7.1 ; D7.1@344.49,1368.7 322.83,1390.35 322.83,1391.61 319.68,1394.76 319.68,1416.26 318.9,1417.05 318.9,1437.28 319.68,1438.07 319.68,1459.57 322.83,1462.72 322.83,1463.98 344.49,1485.63 402.95,1485.63 403.54,1486.22 504.92,1486.22 J5.MP@556.1,1537.4 ; v1(387.8,1240.16) 397.64,1230.32 J4.4 ; v1(472.44,1358.27) 473.62,1357.09 v1(473.62,1311.81) ; v1(545.08,1221.65) 545.08,1250.79 J4.MP@556.1,1261.81
  Top Layer w9.84: v1(61.42,948.43) 61.42,954.13 93.5,986.22 93.5,1041.34 93.5,1215.94 v1(93.31,1216.14) ; v1(174.41,1060.15) 174.41,1062.65 v1(204.28,1092.52) ; v1(207.87,549.61) 216.14,541.34 J6.4@246.06,541.34 ; v1(217.72,830.71) 231.5,816.93 J7.4@246.06,816.93 ; J8.4@246.06,1092.52 246.65,1093.11 305.12,1093.11 D5.1@344.49,1093.11 ; D13.1@305.12,1210.04 344.49,1210.04 402.95,1210.04 J4.4@403.54,1210.63 ; D4.1@344.49,934.45 397.05,934.45 J3.4 397.64,956.69 v1(392.52,961.81) ; J2.MP@550.2,710.63 590.55,710.63 v1(610.24,690.94) ; J2.MP@556.1,710.63 556.1,765.75 583.46,765.75 631.89,814.17 631.89,910.43 556.1,986.22 J4.MP@556.1,1041.34 ; J4.MP@556.1,1261.81 556.1,1316.93 J5.MP@556.1,1537.4
  Top Layer w15.75: v1(21.26,698.82) 48.82,671.26 v1(88.58,671.26) 98.82,661.02 v1(140.55,661.02) ; v1(21.26,777.56) 50.85,777.56 v1(78.54,805.25) ; v1(39.37,1535.43) 19.68,1515.75 19.68,1364.57 19.68,1269.69 27.56,1261.81 93.5,1261.81 93.5,1216.34 v1(93.31,1216.14) ; v1(40.55,1053.15) 52.36,1041.34 J8.MP@93.5,1041.34 ; J6.MP@93.5,490.16 120.08,490.16 153.54,456.69 ; v1(215.75,1258.66) 218.5,1255.91 247.56,1255.91 265.75,1274.09 v1(265.75,1289.37) ; J6.4@246.06,541.34 246.65,541.93 305.12,541.93 D1.1@344.49,541.93 ; J7.4@246.06,816.93 309.72,816.93 v1(329.71,796.94) ; J8.4@246.06,1092.52 257.87,1080.71 ; v1(261.81,505.91) 275.59,492.13 C14.2 ; D9.1@305.12,658.86 D2.1@344.49,658.86 ; v1(321.31,1328.79) 321.31,1345.52 D7.1@344.49,1368.7 ; v1(325.98,1064.57) 325.98,1074.61 D5.1@344.49,1093.11 ; v1(327.17,961.42) 344.49,944.09 D4.1@344.49,934.45 ; D2.1@347.24,661.61 D2.1@344.49,658.86 ; v1(383.86,1515.75) 396.85,1515.75 418.5,1537.4 556.1,1537.4 589.76,1537.4 v1(611.42,1515.75) ; 391.73,1222.44 403.54,1210.63 J4.4@420.1,1210.63 ; J4.4 431.1,1210.63 v1(466.54,1175.2) ; J2.4@402.95,658.86 403.54,659.45 345.08,659.45 D2.1@344.49,658.86 ; v1(537.96,1081.26) 537.96,1059.48 556.1,1041.34 567.91,1053.15 v1(611.42,1053.15) ; J3.MP@556.1,986.22 618.11,986.22 v1(629.92,974.41) ; J4.MP@556.1,1261.81 600.39,1261.81 v1(612.2,1250) ; J5.MP@556.1,1316.93 567.91,1328.74 v1(611.81,1328.74)
  Top Layer w19.68: D13.1 357.28,1256.89 C19.2 ; v1(327.17,961.42) 332.48,961.42 C17.2
  Top Layer w23.62: J6.MP@99.41,490.16 118.31,471.26 v1(146.06,471.26) 157.48,459.84 157.48,452.76 157.48,208.27 J1.4
  Bottom Layer w5.91: v1(39.37,1535.43) 209.45,1535.43 v1(222.44,1548.43) ; Y1.2 360.4,511.4 360.4,589.35 Y1.4 393.65,622.6 U1.24 ; v1(473.62,1311.81) 545.08,1240.35 v1(545.08,1221.65) 538.58,1221.65 v1@538.19,1221.26 ; v1(495.33,859.7) 495.33,880.18 U1.10
  Bottom Layer w9.84: v1(61.42,948.43) 75.5,934.35 C2.2 R2.2 ; C9.2 160.91,1023.57 160.91,1046.65 v1(174.41,1060.15) ; U1.39 217.72,875.79 v1(217.72,830.71) ; v1(194.88,1218.5) 215.75,1239.37 v1(215.75,1258.66) ; v1(207.87,549.61) 263.42,494.06 343.06,494.06 Y1.2 ; v1(257.87,790.16) 264.66,796.94 v1(329.71,796.94) ; Y1.2@381.23,510.9 Y1.2 ; C12.2 464.57,575.44 U2.8 479.44,556.39 C22.2 405.51,482.46 C28.2 376.9,510.9 Y1.2 ; v1(503.94,625.98) 519.97,642.02 C10.2 ; U1.10 543.27,928.12 576.86,928.12 595.33,946.6 C3.2 C1.2 ; v1(610.24,690.94) C21.2
  Bottom Layer w11.81: D24.1 563.71,689.69 C8.2 C8.2@569.61,736.94 ; C21.2 J9.1
  Bottom Layer w15.75: v1(21.26,698.82) v1(21.26,777.56) ; v1(40.55,1053.15) 40.55,969.29 v1(61.42,948.43) ; v1(78.54,805.25) 78.54,753.28 C7.2 ; v1(140.55,661.02) 154.01,674.48 C6.2 ; v1(207.87,549.61) 231.8,573.54 258.29,573.54 ; v1@266.14,1289.37 v1(265.75,1289.37) 305.17,1328.79 v1(321.31,1328.79) ; v1(317.69,501.52) 350.52,501.52 Y1.2 Y1.2@368.83,501.97 ; v1(325.98,1064.57) 354.72,1035.83 354.72,988.98 v1(327.17,961.42) ; v1(329.71,796.94) 374.32,796.94 v1(388.94,782.32) ; v1(365.52,646.7) 368.25,643.97 Y1.4 ; C11.2 537.96,1044 v1(537.96,1081.26) ; C3.2@597.03,974.41 v1(629.92,974.41) ; v1(611.42,1053.15) 612.2,1053.94 v1(612.2,1250) ; v1(611.42,1515.75) 611.42,1329.13 v1(611.81,1328.74)
  Bottom Layer w19.68: C22.2 453.65,569.79 v1(454.72,570.87) ; J9.1 v1(610.24,832.68)
Net-(D15-1): D15.GA D15.RK R7.1 | length 499.7
  Top Layer w5.91: D15.RK 193.7,1346.46 217.8,1322.36 ccw(c226.15,1330.71) 226.15,1318.9 D15.GA 242.52,1318.9 v1(263.39,1339.76)
  Bottom Layer w5.91: v1(263.39,1339.76) 275.34,1351.71 cw(c289.26,1337.8) 289.26,1357.48 327.06,1357.48 cw(c327.06,1318.11) 354.9,1345.95 481.68,1219.17 cw(c467.86,1205.35) 487.4,1205.35 487.4,1128.51 cw(c463.78,1128.51) 480.48,1111.8 R7.1
Net-(D16-1): D16.GA D16.RK R8.1 | length 524.4
  Top Layer w5.91: D16.RK 190.94,1401.57 215.04,1377.48 ccw(c223.4,1385.83) 223.4,1374.02 D16.GA 270.47,1374.02 v1(270.87,1374.41)
  Bottom Layer w5.91: v1(270.87,1374.41) 275.98,1369.29 332.52,1369.29 cw(c332.52,1331.31) 359.38,1358.17 494.02,1223.52 cw(c481.5,1211) 499.21,1211 499.21,1092.04 cw(c491.34,1092.04) 496.91,1086.47 R8.1
Net-(D17-1): D17.GA D17.RK R9.1 | length 579.3
  Top Layer w5.91: D17.RK 190.94,1456.69 215.04,1432.59 ccw(c223.4,1440.94) 223.4,1429.13 D17.GA 269.29,1429.13 v1(270.87,1427.56)
  Bottom Layer w5.91: v1(270.87,1427.56) 290.39,1427.56 cw(c290.39,1388.19) 318.22,1416.03 503.42,1230.83 cw(c482.54,1209.95) 512.07,1209.95 512.07,1059.87 R9.1
Net-(D18-1): D18.GA D18.RK R10.1 | length 676.5
  Top Layer w5.91: D18.RK 191.73,1511.81 215.83,1487.71 ccw(c224.18,1496.06) 224.18,1484.25 D18.GA 269.29,1484.25 v1(269.68,1484.65)
  Bottom Layer w5.91: v1(269.68,1484.65) 270.08,1484.65 514.27,1240.45 cw(c485.04,1211.22) 526.38,1211.22 526.38,1135.6 ccw(c565.75,1135.6) 537.91,1107.76 552.36,1093.3 cw(c535.66,1076.6) 559.28,1076.6 559.28,1023.57 R10.1
Net-(D19-1): D19.GA D19.RK R11.1 | length 385.8
  Top Layer w5.91: v1(78.74,1328.74) 93.57,1343.57 cw(c100.53,1336.61) 100.53,1346.46 D19.RK 123.28,1346.46 cw(c123.28,1334.65) 131.63,1343 155.73,1318.9 D19.GA
  Bottom Layer w5.91: v1(78.74,1328.74) 78.74,1316.03 ccw(c98.43,1316.03) 84.51,1302.11 264.35,1122.26 R11.1
Net-(D20-1): D20.GA D20.RK R12.1 | length 476.7
  Top Layer w5.91: v1(76.77,1402.76) 77.95,1401.57 D20.RK 123.28,1401.57 cw(c123.28,1389.76) 131.63,1398.12 155.73,1374.02 D20.GA
  Bottom Layer w5.91: v1(76.77,1402.76) 65.21,1391.2 ccw(c79.13,1377.28) 59.45,1377.28 59.45,1325.92 ccw(c98.82,1325.92) 70.98,1298.09 246.67,1122.39 cw(c238.32,1114.04) 250.13,1114.04 R12.1
Net-(D21-1): D21.GA D21.RK R13.1 | length 548.4
  Top Layer w5.91: v1(77.95,1456.69) D21.RK 123.28,1456.69 cw(c123.28,1444.88) 131.63,1453.23 155.73,1429.13 D21.GA
  Bottom Layer w5.91: v1(77.95,1456.69) 77.95,1440.04 cw(c58.27,1440.04) 72.19,1426.12 59.17,1413.11 ccw(c87.01,1385.27) 47.64,1385.27 47.64,1322.71 ccw(c91.05,1322.71) 60.35,1292.01 217.72,1134.64 cw(c189.88,1106.8) 229.25,1106.8 R13.1
Net-(J1-Pin_1): J1.1 JP1.1 | length 542
  Top Layer w23.62: J1.1 492.13,208.27 492.13,434.76 cw(c511.81,434.76) 497.89,448.68 v2(501.97,452.76)
  Bottom Layer w15.75: v2(501.97,452.76) 564.96,515.75 JP1.1@610.24,515.75
  Bottom Layer w23.62: v2(501.97,452.76) 557.3,508.08 cw(c578.18,487.2) 578.18,516.73 JP1.1
Net-(U1-EXT_RST#): R3.2 U1.40 | length 67
  Bottom Layer w5.91: R3.2 155.62,945.34 171.11,945.34 cw(c171.11,933.53) 179.46,941.88 U1.40
Net-(U1-REXT): R6.1 U1.27 | length 56.5
  Bottom Layer w9.84: R6.1 250.72,635.56 U1.27
Net-(U1-TEST1#): R5.2 U1.43 | length 67.3
  Bottom Layer w5.91: R5.2 218.26,1007.98 218.26,991.5 ccw(c230.07,991.5) 221.72,983.15 U1.43
Net-(U1-TEST3#): R4.2 U1.45 | length 63.8
  Bottom Layer w5.91: R4.2 233.43,1027.11 U1.45
Net-(U1-VBUS_SENSE): C2.1 R1.2 R2.1 U1.41 | length 173.8
  Bottom Layer w5.91: C2.1 R2.1 126.21,933 cw(c133.17,939.95) 123.33,939.95 123.33,944.33 cw(c133.17,944.33) 126.21,951.29 149.67,974.75 cw(c156.63,967.79) 156.63,977.64 161.01,977.64 cw(c161.01,967.79) 167.97,974.75 R1.2 177.26,971.93 U1.41
Net-(U2-CAP): C28.1 U2.7 | length 85.6
  Bottom Layer w9.84: C28.1 480.18,521.52 ccw(c471.83,529.87) 483.64,529.87 483.64,536.93 U2.7
unconnected-(U1-TEST#2{slash}DNC-Pad44): U1.44
unconnected-(U1-TEST#{slash}SDA-Pad2): U1.2
VIN: C21.1 D24.2 JP1.2 U2.1 U2.2 U2.3 | length 373.8
  Bottom Layer w7.87: U2.2 557.77,611.06 557.77,612.89
  Bottom Layer w9.84: U2.1 553.42,634.55 553.84,634.55
  Bottom Layer w15.75: JP1.2@610.24,594.49 C21.1
  Bottom Layer w23.62: U2.3 557.77,569.31 557.77,612.89 557.77,630.61 553.84,634.55 576.38,657.09 609.65,657.09 C21.1 612.2,654.53 JP1.2
pads on no net: H1. Y1.

## Polygon pours and split planes (outlines as drawn)
GND on Top Layer "Polygon 0" (solid, pour order 7): 698.82,452.76 -49.21,452.76 -49.21,1614.17 698.82,1614.17
+5V on Bottom Layer "Polygon 1" (solid, pour order 8): 145.67,562.99 169.29,561.02 177.17,553.15 177.17,545.28 169.29,537.4 39.37,537.4 17.72,566.93 17.72,588.58 21.65,592.52 92.52,592.52
GND on Bottom Layer "Polygon 2" (solid, pour order 6): 698.82,-19.68 -49.21,-19.68 -49.21,1614.17 698.82,1614.17
+5V on Bottom Layer "Polygon 3" (solid, pour order 9): 336.61,1307.09 340.55,1299.21 372.05,1234.25 435.04,1171.26 456.69,1125.98 456.69,1120.08 448.82,1112.2 435.04,1112.2 423.23,1100.39 421.26,1100.39 289.37,1232.28 289.37,1234.25 299.21,1257.87 289.37,1287.4 289.37,1289.37 299.21,1299.21 326.77,1309.06 330.71,1309.06
+1V8 on Bottom Layer "Polygon 4" (solid, pour order 10): 228.35,661.42 301.18,588.58 293.31,580.71 263.78,580.71 220.47,624.02 220.47,653.54

## Silkscreen, mask and mechanical layers (free items; w line width, h text height)
Top Overlay:
  text "STATUS" at 9,1578.96 h31.5 r270
Bottom Overlay:
  region: 570.87,464.57 566.93,468.5 533.46,433.07 533.46,407.48 527.56,407.48 527.56,435.04 562.99,472.44 559.06,476.38 576.77,482.28
  region: 635.83,824.8 629.92,824.8 629.92,848.43 635.83,848.43
  region: 564.96,600.39 574.8,600.39 574.8,594.49 564.96,594.49 564.96,584.65 559.06,584.65 559.06,594.49 549.21,594.49 549.21,600.39 559.06,600.39 559.06,610.24 564.96,610.24
  lines w5.91: 4.92,1033.46 94.49,1033.46 ; 4.92,1269.69 125.98,1269.69 127.95,1062.99
  text "REMOVE SLDR / BRIDGE TO USE / EXTERNAL / POWER SUPPLY" at 483.13,2383.52 h31.5 r90
  text "7-PORT USB / 2.0 HUB v1.4.0 / rbts.co/h1" at 234.82,2270.36 h39.37 r90
  text "StickHub" at -264.54,1544.72 h70.87 r180
  text "5V" at 7.87,1260.69 h31.5 r180
  text "D-" at 7.87,1201.63 h31.5 r180
  text "D+" at 7.87,1152.42 h31.5 r180
  text "G" at 7.87,1103.21 h31.5 r180
  text "JST SH" at 64.12,983.57 h31.5 r270
Top Solder:
  region: 639.76,994.09 600.39,994.09 600.39,1033.46 639.76,1033.46
  region: 49.21,994.09 9.84,994.09 9.84,1033.46 49.21,1033.46
  region: 49.21,1269.69 9.84,1269.69 9.84,1309.06 49.21,1309.06
  region: 639.76,718.5 600.39,718.5 600.39,757.87 639.76,757.87
  region: 629.92,472.44 610.24,462.6 600.39,462.6 600.39,492.13 639.76,492.13
  region: 49.21,462.6 39.37,462.6 19.68,472.44 9.84,492.13 49.21,492.13
  region: 639.76,1535.43 600.39,1535.43 600.39,1564.96 610.24,1564.96 629.92,1555.12
  region: 49.21,718.5 9.84,718.5 9.84,757.87 49.21,757.87
  region: 639.76,1269.69 600.39,1269.69 600.39,1309.06 639.76,1309.06
  lines w7.87: 9.84,492.13 19.68,472.44 39.37,462.6 49.21,462.6 49.21,492.13 9.84,492.13 ; 9.84,718.5 49.21,718.5 49.21,757.87 9.84,757.87 9.84,718.5 ; 9.84,994.09 49.21,994.09 49.21,1033.46 9.84,1033.46 9.84,994.09 ; 9.84,1269.69 49.21,1269.69 49.21,1309.06 9.84,1309.06 9.84,1269.69 ; 600.39,462.6 610.24,462.6 629.92,472.44 639.76,492.13 600.39,492.13 600.39,462.6 ; 600.39,718.5 639.76,718.5 639.76,757.87 600.39,757.87 600.39,718.5 ; 600.39,994.09 639.76,994.09 639.76,1033.46 600.39,1033.46 600.39,994.09 ; 600.39,1269.69 639.76,1269.69 639.76,1309.06 600.39,1309.06 600.39,1269.69 ; 600.39,1535.43 639.76,1535.43 629.92,1555.12 610.24,1564.96 600.39,1564.96 600.39,1535.43

## Text inside footprints (layer, text, board x,y; h text height)
D15: F.Fab "GREEN TOPSIDE MARKER" at 179.14,1335.65 h1
D16: F.Fab "GREEN TOPSIDE MARKER" at 179.14,1390.77 h1
D17: F.Fab "GREEN TOPSIDE MARKER" at 179.14,1445.89 h1
D18: F.Fab "GREEN TOPSIDE MARKER" at 179.14,1501 h1
D19: F.Fab "GREEN TOPSIDE MARKER" at 100.4,1335.65 h1
D20: F.Fab "GREEN TOPSIDE MARKER" at 100.4,1390.77 h1
D21: F.Fab "GREEN TOPSIDE MARKER" at 100.4,1445.89 h1
J1: Top Overlay "-" at 142.86,16.06 h23.62 r90; Top Overlay "DP" at 253.09,34.63 h23.62 r90; Top Overlay "DN" at 442.07,34.07 h23.62 r90; Top Overlay "+" at 548.37,16.06 h23.62 r90; User.Comments "Insertion depth" at 175.89,333.1 h11.81; User.Comments "Front clearance" at 171.11,4.36 h11.81
LOGO1: Bottom Overlay "C" at 275.35,865.3 h23.62 r180; Bottom Solder "C" at 307.33,819.74 h23.62